# Altium PCB Kasli-DIOT.PCBDOC (part 3 of 23)
Units mm, origin at the board's own origin, x right, y up, seen from the top; angles counter-clockwise.
Board outline 222.9 x 100 mm, 10 copper layers (TopLayer, Layer 2, Layer 3, Layer 4, Layer 5, Layer 6, Layer 7, layer 8, Layer 9, BottomLayer), stack 1.564 mm thick; 977 components, 900 nets, 4676 pads, 2725 vias.
Unrouted connection lines stored in the file: 17.
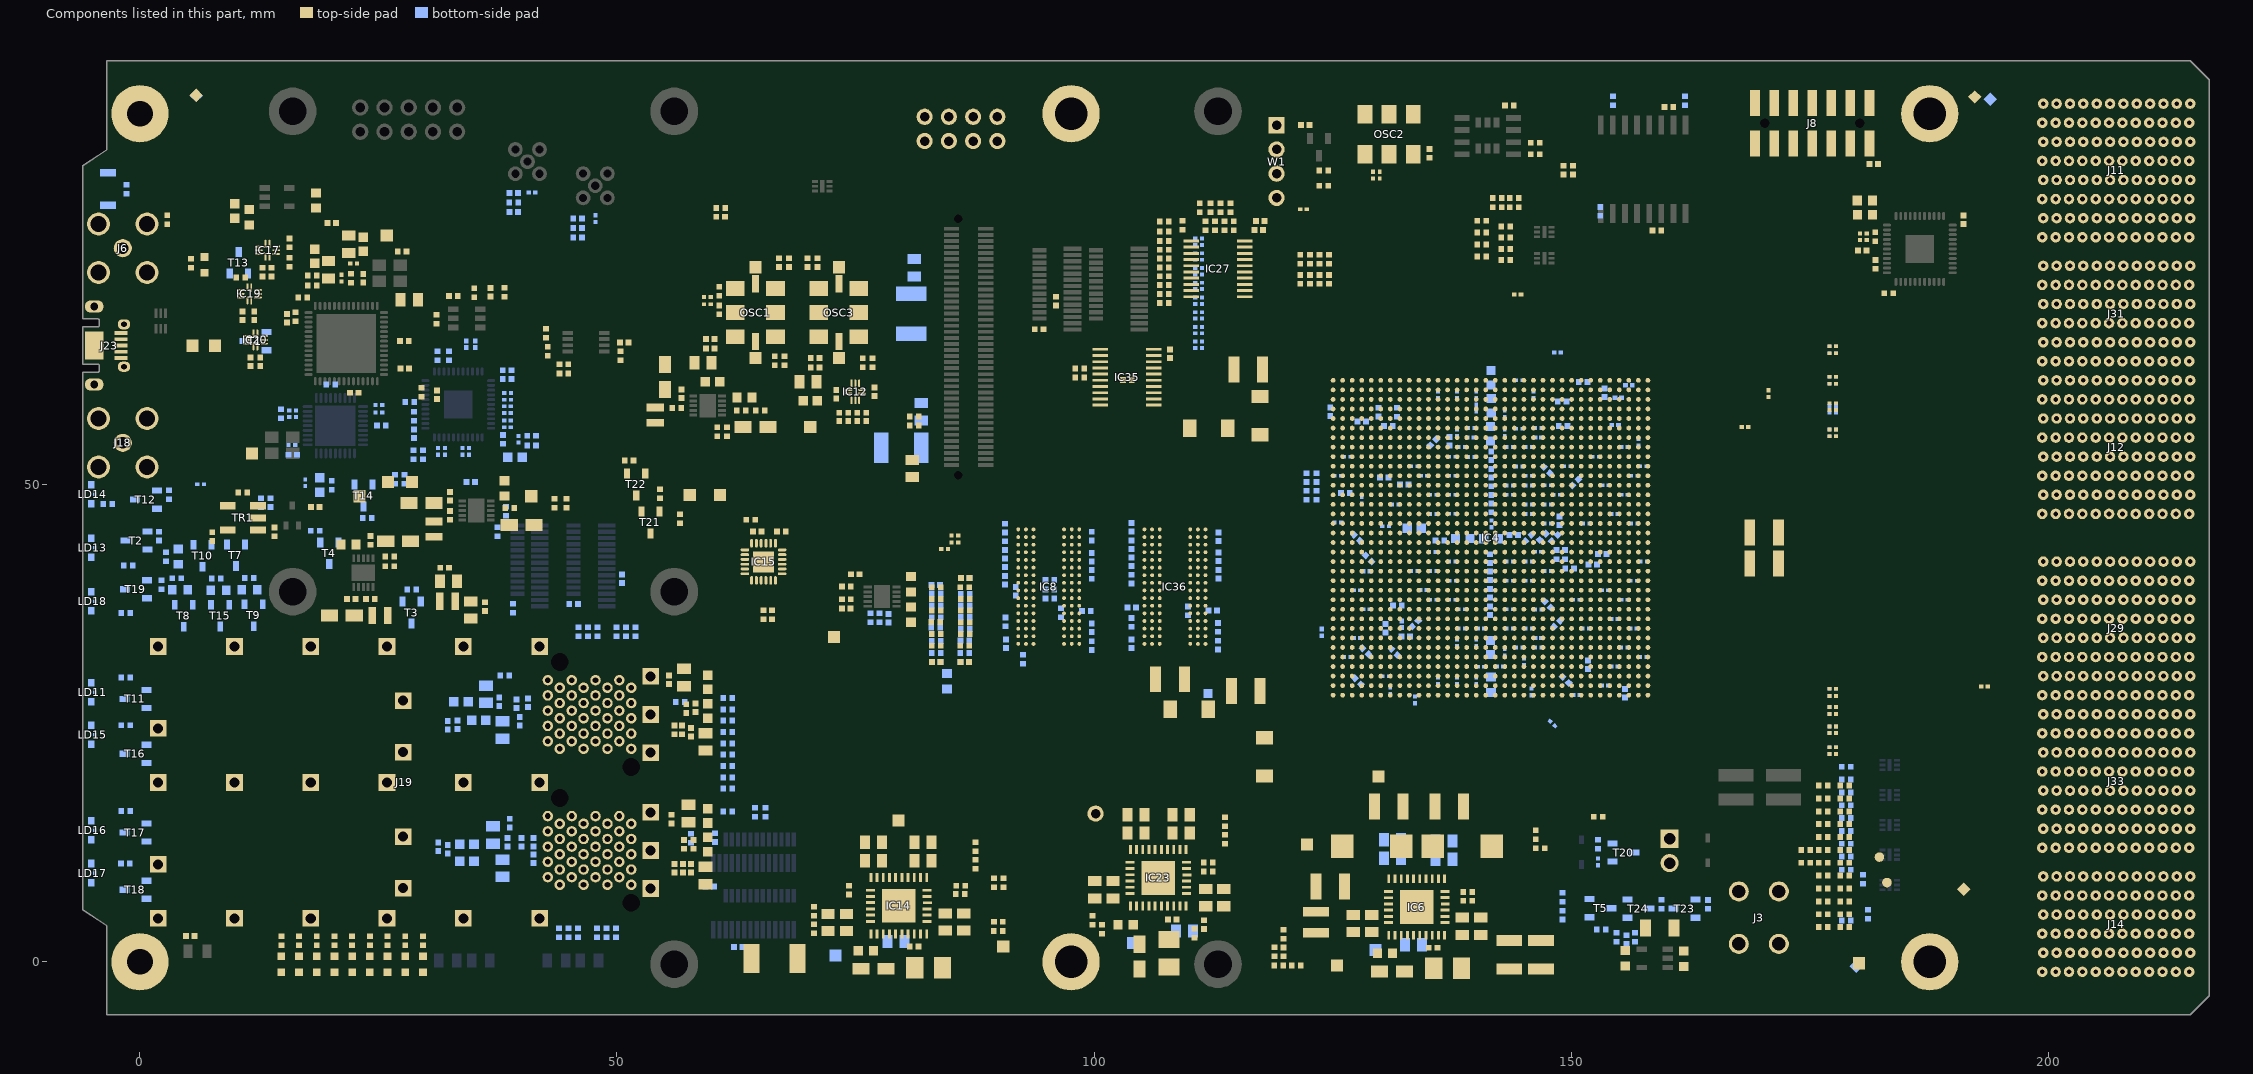
[diagram p11: the components of this part, seen from the top]

## Components (designator, comment, footprint, x,y, rotation, side; value= is the part's Value field where it differs from the comment) (continued)
R161 "100" RESC0603X28N 146.561,54.95 r180 bottom
R162 "10k" RESC1005X40N 121.621,73.645 r90 top
R163 "10k" RESC1005X40N 122.621,73.645 r90 top
R164 "10k" RESC1005X40N 123.621,73.645 r90 top
R165 "10k" RESC1005X40N 124.621,73.645 r90 top
R166 "10k" RESC1005X40N 121.621,71.52 r90 top
R167 "10k" RESC1005X40N 122.621,71.52 r90 top
R168 "10k" RESC1005X40N 123.621,71.52 r90 top
R169 "10k" RESC1005X40N 124.621,71.52 r90 top
R170 "10k" RESC1005X40N 142.266,79.093 r180 top
R171 "10k" RESC1005X40N 142.266,80.068 r180 top
R172 "10k" RESC1005X40N 144.066,79.093 r180 top
R173 "10k" RESC1005X40N 144.066,80.068 r180 top
R174 "10k" RESC1005X40N 38.761,14.55 r90 bottom
R175 "0" RESC1005X40N 65.56,15.66 r90 bottom
R176 "10k" RESC1005X40N 65.375,36.367 r270 top
R177 "10k" RESC1005X40N 66.261,36.367 r270 top
R178 "47k" RESC1005X40N 114.647,77.159 r90 top
R179 "47k" RESC1005X40N 114.286,79.063 r90 top
R180 "47k" RESC1005X40N 113.659,77.159 r90 top
R181 "47k" RESC1005X40N 113.245,79.063 r90 top
R182 "47k" RESC1005X40N 112.672,77.159 r90 top
R183 "10k" RESC1005X40N 61.606,21.716 r0 bottom
R184 "10k" RESC1005X40N 61.606,24.092 r0 bottom
R185 "10k" RESC1005X40N 51.947,34.595 r90 bottom
R186 "10k" RESC1005X40N 49.947,34.595 r90 bottom
R187 "10k" RESC1005X40N 43.913,3.055 r270 bottom
R188 "10k" RESC1005X40N 45.913,3.055 r270 bottom
R189 "10k" RESC1005X40N 43.461,48.075 r270 top
R190 "10k" RESC1005X40N 44.686,48.05 r270 top
R191 "47k" RESC1005X40N 112.194,79.063 r90 top
R192 "47k" RESC1005X40N 111.684,77.159 r90 top
R193 "10k" RESC1005X40N 61.606,19.34 r180 bottom
R194 "10k" RESC1005X40N 10.561,71.75 r0 top
R195 "10k" RESC1005X40N 15.657,75.349 r90 top
R196 "10k" RESC1005X40N 15.657,73.317 r270 top
R197 "10k" RESC1005X40N 17.054,69.634 r180 top
R198 "10k" RESC1005X40N 16.292,67.602 r270 top
R199 "12k" RESC1005X40N 22.134,71.666 r270 top
R200 "2k2" RESC1005X40N 18.07,70.904 r0 top
R201 "10k" RESC1005X40N 18.07,71.92 r0 top
R202 "10k" RESC1005X40N 31.086,67.375 r270 top
R203 "10k" RESC1005X40N 35.036,70.15 r90 top
R204 "10k" RESC1005X40N 38.211,70.2 r90 top
R205 "2k2" RESC1005X40N 32.861,69.797 r0 top
R206 "10k" RESC1005X40N 42.575,65.875 r90 top
R207 "10k" RESC1005X40N 42.746,64.021 r270 top
R208 "2k2" RESC1005X40N 50.361,63.55 r90 top
R209 "10k" RESC1005X40N 23.811,46.5 r0 bottom
R210 "10k" RESC1005X40N 123.331,48.906 r90 bottom
R211 "10k" RESC1005X40N 122.29,48.906 r90 bottom
R212 "47k" RESC1005X40N 111.085,79.063 r90 top
R213 "10k" RESC1005X40N 46.947,34.595 r270 bottom
R214 "0" RESC1005X40N 7.574,44.581 r90 top
R215 "10k" RESC1005X40N 61.606,18.152 r180 bottom
R216 "240" RESC1005X40N -1.489,15.8 r180 bottom
R217 "10k" RESC1005X40N 61.606,15.776 r0 bottom
R218 "10k" RESC1005X40N 49.913,3.055 r270 bottom
R219 "10k" RESC1005X40N 57.761,12.946 r90 bottom
R220 "240" RESC1005X40N -1.519,10.3 r180 bottom
R221 "1k" RESC1005X40N 107.383,75.571 r0 top
R222 "10k" RESC1005X40N 48.913,3.055 r90 bottom
R223 "10k" RESC1005X40N 47.913,3.055 r90 bottom
R224 "1k" RESC1005X40N 107.383,74.643 r0 top
R225 "10k" RESC1005X40N 81.161,57.14 r180 top
R226 "240" RESC1005X40N -1.489,36.55 r0 bottom
R227 "2k2" RESC1005X40N 2.236,39.525 r90 bottom
R228 "1k" RESC1005X40N 107.383,73.714 r0 top
R229 "1k" RESC1005X40N 107.383,72.786 r0 top
R230 "1k" RESC1005X40N 107.383,76.57 r0 top
R231 "1k" RESC1005X40N 98.498,61.241 r0 top
R232 "1k" RESC1005X40N 107.383,71.857 r0 top
R233 "1k" RESC1005X40N 107.383,70.928 r0 top
R234 "1k" RESC1005X40N 107.383,70 r0 top
R235 "1k" RESC1005X40N 107.383,69.071 r0 top
R236 "0" RESC1005X40N 26.711,50.6 r90 bottom
R237 "0" RESC1005X40N 27.712,50.6 r90 bottom
R238 "0" RESC1005X40N 103.508,60.965 r0 top
R239 "0" RESC1005X40N 143.155,73.543 r0 top
R240 "10k" RESC1005X40N 98.502,62.189 r0 top
R241 "200k" RESC1005X40N 44.443,61.683 r180 top
R242 "10k" RESC1005X40N 28.661,53.15 r270 bottom
R243 "10k" RESC1005X40N 29.661,53.15 r90 bottom
R244 "10k" RESC1005X40N 73.761,57.55 r180 top
R245 "10k" RESC1005X40N 75.636,57.55 r0 top
R246 "10k" RESC1005X40N 73.761,56.675 r0 top
R247 "10k" RESC1005X40N 75.636,56.675 r180 top
R248 "430k" RESC1005X40N 61.511,55.55 r270 top
R249 "0" RESC1005X40N 143.155,74.726 r0 top
R250 "82k" RESC1005X40N 26.164,42.465 r0 top
R251 "82k" RESC1005X40N 60.511,55.55 r90 top
R252 "10k" RESC1005X40N 26.164,41.465 r0 top
R253 "0" RESC1005X40N 32.486,46.786 r90 top
R254 "82k" RESC1005X40N 38.386,47.225 r90 bottom
R255 "33k" RESC1005X40N 38.761,47.55 r180 top
R256 "10k" RESC1005X40N 37.486,45.075 r270 bottom
R257 "0" RESC1005X40N 140.662,77.677 r0 top
R258 "1k" RESC1005X40N 164.341,6.008 r270 bottom
R259 "1k" RESC1005X40N 159.486,6.025 r90 bottom
R260 "10k" RESC1005X40N 156.711,2.595 r270 bottom
R261 "10k" RESC1005X40N 153.186,3.375 r180 bottom
R262 "22" RESC1005X40N 178.861,11.05 r0 bottom
R263 "22" RESC1005X40N 178.861,12.371 r0 bottom
R264 "10k" RESC1005X40N 146.261,84.65 r0 top
R265 "10k" RESC1005X40N 146.261,85.85 r0 top
R266 "22" RESC1005X40N 178.861,15.064 r0 bottom
R267 "22" RESC1005X40N 178.861,19.104 r0 bottom
R268 "22" RESC1005X40N 178.706,18.473 r0 top
R269 "22" RESC1005X40N 178.706,17.124 r0 top
R270 "22" RESC1005X40N 178.861,16.411 r0 bottom
R271 "22" RESC1005X40N 178.861,13.718 r0 bottom
R272 "22" RESC1005X40N 178.861,9.65 r0 bottom
R273 "100" RESC1005X40N 181.886,76 r90 top
R274 "0" RESC1005X40N 140.662,73.928 r0 top
R275 "0" RESC1005X40N 143.155,75.909 r0 top
R276 "22" RESC1005X40N 178.706,15.776 r0 top
R277 "22" RESC1005X40N 178.861,4.35 r0 bottom
R278 "22" RESC1005X40N 178.706,6.338 r0 top
R279 "22" RESC1005X40N 178.706,14.428 r0 top
R280 "22" RESC1005X40N 178.706,13.079 r0 top
R281 "22" RESC1005X40N 178.706,11.731 r0 top
R282 "22" RESC1005X40N 178.706,3.641 r0 top
R283 "22" RESC1005X40N 178.706,7.686 r0 top
R284 "22" RESC1005X40N 178.706,10.383 r0 top
R285 "22" RESC1005X40N 178.706,9.034 r0 top
R286 "22" RESC1005X40N 178.706,4.989 r0 top
R287 "22" RESC1005X40N 178.861,17.757 r0 bottom
R288 "22" RESC1005X40N 178.861,20.45 r0 bottom
R289 "10k" RESC1005X40N -1.4,81 r90 bottom
R290 "0" RESC1005X40N 140.662,75.178 r0 top
R291 "0" RESC1005X40N 140.662,76.428 r0 top
R292 "0" RESC1005X40N 152.832,15.206 r0 top
R293 "4k7" RESC1005X40N 181.111,4.989 r270 bottom
R294 "4k7" RESC1005X40N 180.586,8.633 r270 bottom
R295 "4k7" RESC1005X40N 174.604,10.383 r0 top
R296 "4k7" RESC1005X40N 174.611,11.731 r0 top
R297 "47k" RESC1005X40N 109.288,77.196 r270 top
R298 "39" RESC1005X40N 95.386,38.075 r180 bottom
R299 "3k3" RESC1608X55N 4.194,39.001 r0 bottom
R300 "4k7" RESC1005X40N 176.456,4.989 r180 top
R301 "0" RESC1005X40N 2.859,77.776 r270 top
R302 "3k3" RESC1608X55N 11.476,38.981 r0 bottom
R303 "3k3" RESC1608X55N 4.011,42.475 r270 bottom
R304 "200" RESC1005X40N 60.715,68.325 r90 top
R305 "200" RESC1005X40N 60.721,70.297 r270 top
R306 "10k" RESC1005X40N 3.872,40.204 r0 bottom
R307 "10k" RESC1005X40N 11.462,40.235 r0 bottom
R308 "10k" RESC1005X40N 2.747,42.45 r270 bottom
R309 "3k3" RESC1608X55N 8.225,38.962 r0 bottom
R310 "10k" RESC1005X40N 7.986,40.175 r0 bottom
SW1 "Switch" SW_OMRON_B3U-3000PM -3.364,81 r90 bottom
T1 "BSS138LT1G" SOT95P240X110-3N 12.101,65.062 r180 bottom
T2 "BSS138LT1G" SOT95P240X110-3N -0.386,44.162 r180 bottom
T3 "BSS138LT1G" SOT95P240X110-3N 28.474,36.61 r270 bottom
T4 "BSS138LT1G" SOT95P240X110-3N 19.844,42.825 r270 bottom
T5 "BSS138LT1G" SOT95P240X110-3N 153.111,5.625 r0 bottom
T7 "BSS138LT1G" SOT95P240X110-3N 10.061,42.617 r270 bottom
T8 "BC847B" SOT95P230X110-3N 4.586,36.287 r270 bottom
T9 "BC847B" SOT95P230X110-3N 11.911,36.313 r270 bottom
T10 "BC847B" SOT95P230X110-3N 6.554,42.55 r270 bottom
T11 "BSS138LT1G" SOT95P240X110-3N -0.489,27.55 r180 bottom
T12 "BSS138LT1G" SOT95P240X110-3N 0.624,48.45 r180 bottom
T13 "BSS138LT1G" SOT95P240X110-3N 10.361,73.275 r90 bottom
T14 "BSS138LT1G" SOT95P240X110-3N 23.436,48.875 r270 bottom
T15 "BC847B" SOT95P230X110-3N 8.405,36.298 r270 bottom
T16 "BSS138LT1G" SOT95P240X110-3N -0.489,21.8 r180 bottom
T17 "BSS138LT1G" SOT95P240X110-3N -0.489,13.55 r180 bottom
T18 "BSS138LT1G" SOT95P240X110-3N -0.489,7.55 r180 bottom locked
T19 "BSS138LT1G" SOT95P240X110-3N -0.438,39.05 r180 bottom
T20 "BSS138LT1G" SOT95P240X110-3N 155.511,11.45 r0 bottom
T21 "BSS138LT1G" SOT95P240X110-3N 53.511,46.05 r270 top
T22 "BSS138LT1G" SOT95P240X110-3N 52.011,50.05 r270 top
T23 "BSS138LT1G" SOT95P240X110-3N 161.911,5.575 r180 bottom
T24 "BSS138LT1G" SOT95P240X110-3N 157.061,5.575 r0 bottom
TP1 "Test Point" TPS127 11.761,53.3 r0 top
TP2 "Test Point" TPS127 26.011,50.3 r0 top
TP3 "Test Point" TPS127 28.511,50.3 r0 top
TP4 "Test Point" TPS127 70.261,56.05 r270 top
TP5 "Test Point" TPS127 129.509,1.258 r90 bottom
TP6 "Test Point" TPS127 180.174,-0.156 r270 top
TP7 "Test Point" TPS127 72.74,34.035 r0 top
TP8 "Test Point" TPS127 79.511,14.825 r90 top
TP9 "Test Point" TPS127 129.811,19.425 r90 top
TP10 "Test Point" TPS127 90.492,1.625 r90 top
TP11 "Test Point" TPS127 122.336,12.3 r180 top
TP12 "Test Point" TPS127 125.461,-0.375 r180 top
TP15 "Test Point" TPS127 25.861,76.125 r90 top
TP16 "Test Point" TPS127 7.874,64.575 r90 top
TP17 "Test Point" TPS127 5.524,64.575 r90 top
TP18 "Test Point" TPS127 57.629,48.925 r90 top
TP19 "Test Point" TPS127 60.779,48.925 r90 top
TP20 "Test Point" TPS127 23.011,48.8 r90 top
TP21 "Test Point" TPS127 64.511,63.3 r90 top
TP22 "Test Point" TPS127 64.511,72.8 r90 top
TP23 "Test Point" TPS127 73.261,63.3 r270 top
TP24 "Test Point" TPS127 73.261,72.8 r270 top
TP25 "Test Point" TPS127 41.011,48.8 r0 top
TP26 "Plated Hole" c170h100 87.326,86.035 r0 top
TP27 "Plated Hole" c170h100 84.786,86.035 r0 top
TP28 "Plated Hole" c170h100 89.866,88.575 r0 top
TP29 "Plated Hole" c170h100 87.326,88.575 r0 top
TP30 "Plated Hole" c170h100 84.786,88.575 r0 top
TP31 "Plated Hole" c170h100 89.866,86.035 r270 top
TP32 "Plated Hole" c170h100 82.246,88.575 r0 top
TP33 "Plated Hole" c170h100 82.246,86.035 r180 top
TP34 "Test Point" TPS127 72.9,0.675 r0 bottom
TP35 "Plated Hole" c170h100 100.161,15.534 r0 top
TP36 "Test Point" TPS127 104.1,1.975 r180 bottom
TR1 "1:2" XFMR_MINI-CIRCUITS_AT1521 10.786,46.525 r270 top
W1 "Header 4" SAMTEC_HTSW-104-23-L-S 119.136,87.69 r270 top
WASHER1 "D11.1xd6.6" Keystone_7687 -51.473,85.385 r0 top
WASHER2 "D11.1xd6.6" Keystone_7687 -48.398,85.385 r0 top

## Footprints (in the part's own frame and the unit in brackets; to place one, negate y for a bottom-side part, rotate by r counter-clockwise, add the part's x,y. Pads: shape width x height; smd on the part's side, far side on the other; paste and mask are expansions set on the pad)
AMPHENOL_919-383J-51A [mm] "50 Ohm, RF Connector, MCX Right Angle PCB Receptacle Jack"
  round 1.9 hole 1.2: 1(0,0)
  round 2.4 hole 1.7: 2(-2.54,2.54) 2(-2.54,-2.54) 2(2.54,2.54) 2(2.54,-2.54)
  silkscreen extent -3,-3 6.5,3, body extent -3,-3 6.5,3, height 6
AMPHENOL_10052824-101LF [mm] "72 Contacts, 2mm Pitch, 6 Columns, 4 Pairs per Column, 2 Walls, Right Angle Header"
  round 1.1 hole 0.5: A1(-5,-7.65) A2(-3,-7.75) A3(-1,-7.65) A4(1,-7.75) A5(3,-7.65) A6(5,-7.75) B1(-5,-6.25) B2(-3,-6.35) B3(-1,-6.25) B4(1,-6.35) B5(3,-6.25) B6(5,-6.35) C1(-5,-4.85) C2(-3,-4.95) C3(-1,-4.85) C4(1,-4.95) C5(3,-4.85) C6(5,-4.95) D1(-5,-3.45) D2(-3,-3.55) D3(-1,-3.45) D4(1,-3.55) D5(3,-3.45) D6(5,-3.55) E1(-5,-2.05) E2(-3,-2.15) E3(-1,-2.05) E4(1,-2.15) E5(3,-2.05) E6(5,-2.15) F1(-5,-0.65) F2(-3,-0.75) F3(-1,-0.65) F4(1,-0.75) F5(3,-0.65) F6(5,-0.75) G1(-5,0.75) G2(-3,0.65) G3(-1,0.75) G4(1,0.65) G5(3,0.75) G6(5,0.65) H1(-5,2.15) H2(-3,2.05) H3(-1,2.15) H4(1,2.05) H5(3,2.15) H6(5,2.05) I1(-5,3.55) I2(-3,3.45) I3(-1,3.55) I4(1,3.45) I5(3,3.55) I6(5,3.45) J1(-5,4.95) J2(-3,4.85) J3(-1,4.95) J4(1,4.85) J5(3,4.95) J6(5,4.85) K1(-5,6.35) K2(-3,6.25) K3(-1,6.35) K4(1,6.25) K5(3,6.35) K6(5,6.25) L1(-5,7.75) L2(-3,7.65) L3(-1,7.75) L4(1,7.65) L5(3,7.75) L6(5,7.65)
  silkscreen extent -5.95,-21.95 5.95,11.85, body extent -5.95,-21.95 5.95,11.85, height 15.25
AMPHENOL_10052825-101LF [mm] "72 Contacts, 2mm Pitch, 6 Columns, 4 Pairs per Column, 4 Walls, Right Angle Header"
  round 1.1 hole 0.5: A1(-5,-7.65) A2(-3,-7.75) A3(-1,-7.65) A4(1,-7.75) A5(3,-7.65) A6(5,-7.75) B1(-5,-6.25) B2(-3,-6.35) B3(-1,-6.25) B4(1,-6.35) B5(3,-6.25) B6(5,-6.35) C1(-5,-4.85) C2(-3,-4.95) C3(-1,-4.85) C4(1,-4.95) C5(3,-4.85) C6(5,-4.95) D1(-5,-3.45) D2(-3,-3.55) D3(-1,-3.45) D4(1,-3.55) D5(3,-3.45) D6(5,-3.55) E1(-5,-2.05) E2(-3,-2.15) E3(-1,-2.05) E4(1,-2.15) E5(3,-2.05) E6(5,-2.15) F1(-5,-0.65) F2(-3,-0.75) F3(-1,-0.65) F4(1,-0.75) F5(3,-0.65) F6(5,-0.75) G1(-5,0.75) G2(-3,0.65) G3(-1,0.75) G4(1,0.65) G5(3,0.75) G6(5,0.65) H1(-5,2.15) H2(-3,2.05) H3(-1,2.15) H4(1,2.05) H5(3,2.15) H6(5,2.05) I1(-5,3.55) I2(-3,3.45) I3(-1,3.55) I4(1,3.45) I5(3,3.55) I6(5,3.45) J1(-5,4.95) J2(-3,4.85) J3(-1,4.95) J4(1,4.85) J5(3,4.95) J6(5,4.85) K1(-5,6.35) K2(-3,6.25) K3(-1,6.35) K4(1,6.25) K5(3,6.35) K6(5,6.25) L1(-5,7.75) L2(-3,7.65) L3(-1,7.75) L4(1,7.65) L5(3,7.75) L6(5,7.65)
  silkscreen extent -6.95,-21.95 6.95,11.85, body extent -6.95,-21.95 6.95,11.85, height 15.25
AMPHENOL_10052837-101LF [mm] "96 Contacts, 2mm Pitch, 8 Columns, 4 Pairs per Column, 2 Walls, Right Angle Header"
  round 1.1 hole 0.5: A1(-7,-7.65) A2(-5,-7.75) A3(-3,-7.65) A4(-1,-7.75) A5(1,-7.65) A6(3,-7.75) A7(5,-7.65) A8(7,-7.75) B1(-7,-6.25) B2(-5,-6.35) B3(-3,-6.25) B4(-1,-6.35) B5(1,-6.25) B6(3,-6.35) B7(5,-6.25) B8(7,-6.35) C1(-7,-4.85) C2(-5,-4.95) C3(-3,-4.85) C4(-1,-4.95) C5(1,-4.85) C6(3,-4.95) C7(5,-4.85) C8(7,-4.95) D1(-7,-3.45) D2(-5,-3.55) D3(-3,-3.45) D4(-1,-3.55) D5(1,-3.45) D6(3,-3.55) D7(5,-3.45) D8(7,-3.55) E1(-7,-2.05) E2(-5,-2.15) E3(-3,-2.05) E4(-1,-2.15) E5(1,-2.05) E6(3,-2.15) E7(5,-2.05) E8(7,-2.15) F1(-7,-0.65) F2(-5,-0.75) F3(-3,-0.65) F4(-1,-0.75) F5(1,-0.65) F6(3,-0.75) F7(5,-0.65) F8(7,-0.75) G1(-7,0.75) G2(-5,0.65) G3(-3,0.75) G4(-1,0.65) G5(1,0.75) G6(3,0.65) G7(5,0.75) G8(7,0.65) H1(-7,2.15) H2(-5,2.05) H3(-3,2.15) H4(-1,2.05) H5(1,2.15) H6(3,2.05) H7(5,2.15) H8(7,2.05) I1(-7,3.55) I2(-5,3.45) I3(-3,3.55) I4(-1,3.45) I5(1,3.55) I6(3,3.45) I7(5,3.55) I8(7,3.45) J1(-7,4.95) J2(-5,4.85) J3(-3,4.95) J4(-1,4.85) J5(1,4.95) J6(3,4.85) J7(5,4.95) J8(7,4.85) K1(-7,6.35) K2(-5,6.25) K3(-3,6.35) K4(-1,6.25) K5(1,6.35) K6(3,6.25) K7(5,6.35) K8(7,6.25) L1(-7,7.75) L2(-5,7.65) L3(-3,7.75) L4(-1,7.65) L5(1,7.75) L6(3,7.65) L7(5,7.75) L8(7,7.65)
  silkscreen extent -7.95,-21.95 7.95,11.85, body extent -7.95,-21.95 7.95,11.85, height 15.25
AMPHENOL_10052838-101LF [mm] "96 Contacts, 2mm Pitch, 8 Columns, 4 Pairs per Column, 4 Walls, Right Angle Header"
  round 1.1 hole 0.5: A1(-7,-7.65) A2(-5,-7.75) A3(-3,-7.65) A4(-1,-7.75) A5(1,-7.65) A6(3,-7.75) A7(5,-7.65) A8(7,-7.75) B1(-7,-6.25) B2(-5,-6.35) B3(-3,-6.25) B4(-1,-6.35) B5(1,-6.25) B6(3,-6.35) B7(5,-6.25) B8(7,-6.35) C1(-7,-4.85) C2(-5,-4.95) C3(-3,-4.85) C4(-1,-4.95) C5(1,-4.85) C6(3,-4.95) C7(5,-4.85) C8(7,-4.95) D1(-7,-3.45) D2(-5,-3.55) D3(-3,-3.45) D4(-1,-3.55) D5(1,-3.45) D6(3,-3.55) D7(5,-3.45) D8(7,-3.55) E1(-7,-2.05) E2(-5,-2.15) E3(-3,-2.05) E4(-1,-2.15) E5(1,-2.05) E6(3,-2.15) E7(5,-2.05) E8(7,-2.15) F1(-7,-0.65) F2(-5,-0.75) F3(-3,-0.65) F4(-1,-0.75) F5(1,-0.65) F6(3,-0.75) F7(5,-0.65) F8(7,-0.75) G1(-7,0.75) G2(-5,0.65) G3(-3,0.75) G4(-1,0.65) G5(1,0.75) G6(3,0.65) G7(5,0.75) G8(7,0.65) H1(-7,2.15) H2(-5,2.05) H3(-3,2.15) H4(-1,2.05) H5(1,2.15) H6(3,2.05) H7(5,2.15) H8(7,2.05) I1(-7,3.55) I2(-5,3.45) I3(-3,3.55) I4(-1,3.45) I5(1,3.55) I6(3,3.45) I7(5,3.55) I8(7,3.45) J1(-7,4.95) J2(-5,4.85) J3(-3,4.95) J4(-1,4.85) J5(1,4.95) J6(3,4.85) J7(5,4.95) J8(7,4.85) K1(-7,6.35) K2(-5,6.25) K3(-3,6.35) K4(-1,6.25) K5(1,6.35) K6(3,6.25) K7(5,6.35) K8(7,6.25) L1(-7,7.75) L2(-5,7.65) L3(-3,7.75) L4(-1,7.65) L5(1,7.75) L6(3,7.65) L7(5,7.75) L8(7,7.65)
  silkscreen extent -8.95,-21.95 8.95,11.85, body extent -8.95,-21.95 8.95,11.85, height 15.25
AMPHENOL_U77A11108000P [mm] "Plastic Dust Cover SFP Cage"
  silkscreen extent -4,-6.82 4.9,7.87, body extent -4.03,-6.82 4.9,7.87, height 5.1
AMPHENOL_UE78B212700321 [mm] "SFP 2x2 Press Fit Cage with 4x20 Positions Integrated Receptacles"
  round 1.1 hole 0.6: LB1(-1.25,3.52) LB2(-2.5,4.32) LB3(-1.25,5.12) LB4(-2.5,5.92) LB5(-1.25,6.72) LB6(-2.5,7.52) LB7(-1.25,8.32) LB8(-2.5,9.12) LB9(-1.25,9.92) LB10(-2.5,10.72) LB11(-5,10.72) LB12(-3.75,9.92) LB13(-5,9.12) LB14(-3.75,8.32) LB15(-5,7.52) LB16(-3.75,6.72) LB17(-5,5.92) LB18(-3.75,5.12) LB19(-5,4.32) LB20(-3.75,3.52) LT1(0,10.72) LT2(1.25,9.92) LT3(0,9.12) LT4(1.25,8.32) LT5(0,7.52) LT6(1.25,6.72) LT7(0,5.92) LT8(1.25,5.12) LT9(0,4.32) LT10(1.25,3.52) LT11(3.75,3.52) LT12(2.5,4.32) LT13(3.75,5.12) LT14(2.5,5.92) LT15(3.75,6.72) LT16(2.5,7.52) LT17(3.75,8.32) LT18(2.5,9.12) LT19(3.75,9.92) LT20(2.5,10.72) RB1(-1.25,-10.73) RB2(-2.5,-9.93) RB3(-1.25,-9.13) RB4(-2.5,-8.33) RB5(-1.25,-7.53) RB6(-2.5,-6.73) RB7(-1.25,-5.93) RB8(-2.5,-5.13) RB9(-1.25,-4.33) RB10(-2.5,-3.53) RB11(-5,-3.53) RB12(-3.75,-4.33) RB13(-5,-5.13) RB14(-3.75,-5.93) RB15(-5,-6.73) RB16(-3.75,-7.53) RB17(-5,-8.33) RB18(-3.75,-9.13) RB19(-5,-9.93) RB20(-3.75,-10.73) RT1(0,-3.53) RT2(1.25,-4.33) RT3(0,-5.13) RT4(1.25,-5.93) RT5(0,-6.73) RT6(1.25,-7.53) RT7(0,-8.33) RT8(1.25,-9.13) RT9(0,-9.93) RT10(1.25,-10.73) RT11(3.75,-10.73) RT12(2.5,-9.93) RT13(3.75,-9.13) RT14(2.5,-8.33) RT15(3.75,-7.53) RT16(2.5,-6.73) RT17(3.75,-5.93) RT18(2.5,-5.13) RT19(3.75,-4.33) RT20(2.5,-3.53)
  round 0.5 hole 1.85 unplated: MECH1(-3.75,12.62) MECH2(3.75,1.62) MECH3(-3.75,-1.63) MECH4(3.75,-12.63)
  rect 1.75x1.75 hole 1.05: SHIELD(-45.85,-14.25) SHIELD(-45.85,-8.58) SHIELD(-45.85,0) SHIELD(-45.85,5.67) SHIELD(-45.85,14.25) SHIELD(-37.85,-14.25) SHIELD(-37.85,0) SHIELD(-37.85,14.25) SHIELD(-29.85,-14.25) SHIELD(-29.85,0) SHIELD(-29.85,14.25) SHIELD(-21.85,-14.25) SHIELD(-21.85,0) SHIELD(-21.85,14.25) SHIELD(-20.17,-11.08) SHIELD(-20.17,-5.68) SHIELD(-20.17,3.17) SHIELD(-20.17,8.57) SHIELD(-13.85,-14.25) SHIELD(-13.85,0) SHIELD(-13.85,14.25) SHIELD(-5.85,-14.25) SHIELD(-5.85,0) SHIELD(-5.85,14.25) SHIELD(5.78,-11.13) SHIELD(5.78,-7.13) SHIELD(5.78,-3.13) SHIELD(5.78,3.12) SHIELD(5.78,7.12) SHIELD(5.78,11.12)
  silkscreen extent -57.35,-15.32 5.9,15.31, body extent -57.35,-15.32 5.9,15.31, height 26.39
BGA96C80P9X16_800X1400X120 [mm] "BGA, 0.80mm Pitch, Rect.; 96 Pin, 9 Columns X 16 Rows, 8.00mm X 14.00mm X 1.20mm H"
  round 0.4 smd: A1(-3.2,6) A2(-2.4,6) A3(-1.6,6) A7(1.6,6) A8(2.4,6) A9(3.2,6) B1(-3.2,5.2) B2(-2.4,5.2) B3(-1.6,5.2) B7(1.6,5.2) B8(2.4,5.2) B9(3.2,5.2) C1(-3.2,4.4) C2(-2.4,4.4) C3(-1.6,4.4) C7(1.6,4.4) C8(2.4,4.4) C9(3.2,4.4) D1(-3.2,3.6) D2(-2.4,3.6) D3(-1.6,3.6) D7(1.6,3.6) D8(2.4,3.6) D9(3.2,3.6) E1(-3.2,2.8) E2(-2.4,2.8) E3(-1.6,2.8) E7(1.6,2.8) E8(2.4,2.8) E9(3.2,2.8) F1(-3.2,2) F2(-2.4,2) F3(-1.6,2) F7(1.6,2) F8(2.4,2) F9(3.2,2) G1(-3.2,1.2) G2(-2.4,1.2) G3(-1.6,1.2) G7(1.6,1.2) G8(2.4,1.2) G9(3.2,1.2) H1(-3.2,0.4) H2(-2.4,0.4) H3(-1.6,0.4) H7(1.6,0.4) H8(2.4,0.4) H9(3.2,0.4) J1(-3.2,-0.4) J2(-2.4,-0.4) J3(-1.6,-0.4) J7(1.6,-0.4) J8(2.4,-0.4) J9(3.2,-0.4) K1(-3.2,-1.2) K2(-2.4,-1.2) K3(-1.6,-1.2) K7(1.6,-1.2) K8(2.4,-1.2) K9(3.2,-1.2) L1(-3.2,-2) L2(-2.4,-2) L3(-1.6,-2) L7(1.6,-2) L8(2.4,-2) L9(3.2,-2) M1(-3.2,-2.8) M2(-2.4,-2.8) M3(-1.6,-2.8) M7(1.6,-2.8) M8(2.4,-2.8) M9(3.2,-2.8) N1(-3.2,-3.6) N2(-2.4,-3.6) N3(-1.6,-3.6) N7(1.6,-3.6) N8(2.4,-3.6) N9(3.2,-3.6) P1(-3.2,-4.4) P2(-2.4,-4.4) P3(-1.6,-4.4) P7(1.6,-4.4) P8(2.4,-4.4) P9(3.2,-4.4) R1(-3.2,-5.2) R2(-2.4,-5.2) R3(-1.6,-5.2) R7(1.6,-5.2) R8(2.4,-5.2) R9(3.2,-5.2) T1(-3.2,-6) T2(-2.4,-6) T3(-1.6,-6) T7(1.6,-6) T8(2.4,-6) T9(3.2,-6)
  silkscreen extent -4.72,-7 4,7, body extent -4.07,-7.07 4.08,7.08, height 1.2
BGA1156C100P34X34_3500X3500X310 [mm] "BGA, 1.00mm Pitch, Square; 1156 Pin, 34 Columns X 34 Rows, 35.00mm X 35.00mm X 3.10mm H"
  round 0.5 smd: A1(-16.5,16.5) A2(-15.5,16.5) A3(-14.5,16.5) A4(-13.5,16.5) A5(-12.5,16.5) A6(-11.5,16.5) A7(-10.5,16.5) A8(-9.5,16.5) A9(-8.5,16.5) A10(-7.5,16.5) A11(-6.5,16.5) A12(-5.5,16.5) A13(-4.5,16.5) A14(-3.5,16.5) A15(-2.5,16.5) A16(-1.5,16.5) A17(-0.5,16.5) A18(0.5,16.5) A19(1.5,16.5) A20(2.5,16.5) A21(3.5,16.5) A22(4.5,16.5) A23(5.5,16.5) A24(6.5,16.5) A25(7.5,16.5) A26(8.5,16.5) A27(9.5,16.5) A28(10.5,16.5) A29(11.5,16.5) A30(12.5,16.5) A31(13.5,16.5) A32(14.5,16.5) A33(15.5,16.5) A34(16.5,16.5) AA1(-16.5,-3.5) AA2(-15.5,-3.5) AA3(-14.5,-3.5) AA4(-13.5,-3.5) AA5(-12.5,-3.5) AA6(-11.5,-3.5) AA7(-10.5,-3.5) AA8(-9.5,-3.5) AA9(-8.5,-3.5) AA10(-7.5,-3.5) AA11(-6.5,-3.5) AA12(-5.5,-3.5) AA13(-4.5,-3.5) AA14(-3.5,-3.5) AA15(-2.5,-3.5) AA16(-1.5,-3.5) AA17(-0.5,-3.5) AA18(0.5,-3.5) AA19(1.5,-3.5) AA20(2.5,-3.5) AA21(3.5,-3.5) AA22(4.5,-3.5) AA23(5.5,-3.5) AA24(6.5,-3.5) AA25(7.5,-3.5) AA26(8.5,-3.5) AA27(9.5,-3.5) AA28(10.5,-3.5) AA29(11.5,-3.5) AA30(12.5,-3.5) AA31(13.5,-3.5) AA32(14.5,-3.5) AA33(15.5,-3.5) AA34(16.5,-3.5) AB1(-16.5,-4.5) AB2(-15.5,-4.5) AB3(-14.5,-4.5) AB4(-13.5,-4.5) AB5(-12.5,-4.5) AB6(-11.5,-4.5) AB7(-10.5,-4.5) AB8(-9.5,-4.5) AB9(-8.5,-4.5) AB10(-7.5,-4.5) AB11(-6.5,-4.5) AB12(-5.5,-4.5) AB13(-4.5,-4.5) AB14(-3.5,-4.5) AB15(-2.5,-4.5) AB16(-1.5,-4.5) AB17(-0.5,-4.5) AB18(0.5,-4.5) AB19(1.5,-4.5) AB20(2.5,-4.5) AB21(3.5,-4.5) AB22(4.5,-4.5) AB23(5.5,-4.5) AB24(6.5,-4.5) AB25(7.5,-4.5) AB26(8.5,-4.5) AB27(9.5,-4.5) AB28(10.5,-4.5) AB29(11.5,-4.5) AB30(12.5,-4.5) AB31(13.5,-4.5) AB32(14.5,-4.5) AB33(15.5,-4.5) AB34(16.5,-4.5) AC1(-16.5,-5.5) AC2(-15.5,-5.5) AC3(-14.5,-5.5) AC4(-13.5,-5.5) AC5(-12.5,-5.5) AC6(-11.5,-5.5) AC7(-10.5,-5.5) AC8(-9.5,-5.5) AC9(-8.5,-5.5) AC10(-7.5,-5.5) AC11(-6.5,-5.5) AC12(-5.5,-5.5) AC13(-4.5,-5.5) AC14(-3.5,-5.5) AC15(-2.5,-5.5) AC16(-1.5,-5.5) AC17(-0.5,-5.5) AC18(0.5,-5.5) AC19(1.5,-5.5) AC20(2.5,-5.5) AC21(3.5,-5.5) AC22(4.5,-5.5) AC23(5.5,-5.5) AC24(6.5,-5.5) AC25(7.5,-5.5) AC26(8.5,-5.5) AC27(9.5,-5.5) AC28(10.5,-5.5) AC29(11.5,-5.5) AC30(12.5,-5.5) AC31(13.5,-5.5) AC32(14.5,-5.5) AC33(15.5,-5.5) AC34(16.5,-5.5) AD1(-16.5,-6.5) AD2(-15.5,-6.5) AD3(-14.5,-6.5) AD4(-13.5,-6.5) AD5(-12.5,-6.5) AD6(-11.5,-6.5) AD7(-10.5,-6.5) AD8(-9.5,-6.5) AD9(-8.5,-6.5) AD10(-7.5,-6.5) AD11(-6.5,-6.5) AD12(-5.5,-6.5) AD13(-4.5,-6.5) AD14(-3.5,-6.5) AD15(-2.5,-6.5) AD16(-1.5,-6.5) AD17(-0.5,-6.5) AD18(0.5,-6.5) AD19(1.5,-6.5) AD20(2.5,-6.5) AD21(3.5,-6.5) AD22(4.5,-6.5) AD23(5.5,-6.5) AD24(6.5,-6.5) AD25(7.5,-6.5) AD26(8.5,-6.5) AD27(9.5,-6.5) AD28(10.5,-6.5) AD29(11.5,-6.5) AD30(12.5,-6.5) AD31(13.5,-6.5) AD32(14.5,-6.5) AD33(15.5,-6.5) AD34(16.5,-6.5) AE1(-16.5,-7.5) AE2(-15.5,-7.5) AE3(-14.5,-7.5) AE4(-13.5,-7.5) AE5(-12.5,-7.5) AE6(-11.5,-7.5) AE7(-10.5,-7.5) AE8(-9.5,-7.5) AE9(-8.5,-7.5) AE10(-7.5,-7.5) AE11(-6.5,-7.5) AE12(-5.5,-7.5) AE13(-4.5,-7.5) AE14(-3.5,-7.5) AE15(-2.5,-7.5) AE16(-1.5,-7.5) AE17(-0.5,-7.5) AE18(0.5,-7.5) AE19(1.5,-7.5) AE20(2.5,-7.5) AE21(3.5,-7.5) AE22(4.5,-7.5) AE23(5.5,-7.5) AE24(6.5,-7.5) AE25(7.5,-7.5) AE26(8.5,-7.5) AE27(9.5,-7.5) AE28(10.5,-7.5) AE29(11.5,-7.5) AE30(12.5,-7.5) AE31(13.5,-7.5) AE32(14.5,-7.5) AE33(15.5,-7.5) AE34(16.5,-7.5) AF1(-16.5,-8.5) AF2(-15.5,-8.5) AF3(-14.5,-8.5) AF4(-13.5,-8.5) AF5(-12.5,-8.5) AF6(-11.5,-8.5) AF7(-10.5,-8.5) AF8(-9.5,-8.5) AF9(-8.5,-8.5) AF10(-7.5,-8.5) AF11(-6.5,-8.5) AF12(-5.5,-8.5) AF13(-4.5,-8.5) AF14(-3.5,-8.5) AF15(-2.5,-8.5) AF16(-1.5,-8.5) AF17(-0.5,-8.5) AF18(0.5,-8.5) AF19(1.5,-8.5) AF20(2.5,-8.5) AF21(3.5,-8.5) AF22(4.5,-8.5) AF23(5.5,-8.5) AF24(6.5,-8.5) AF25(7.5,-8.5) AF26(8.5,-8.5) AF27(9.5,-8.5) AF28(10.5,-8.5) AF29(11.5,-8.5) AF30(12.5,-8.5) AF31(13.5,-8.5) AF32(14.5,-8.5) AF33(15.5,-8.5) AF34(16.5,-8.5) AG1(-16.5,-9.5) AG2(-15.5,-9.5) AG3(-14.5,-9.5) AG4(-13.5,-9.5) AG5(-12.5,-9.5) AG6(-11.5,-9.5) AG7(-10.5,-9.5) AG8(-9.5,-9.5) AG9(-8.5,-9.5) AG10(-7.5,-9.5) AG11(-6.5,-9.5) AG12(-5.5,-9.5) AG13(-4.5,-9.5) AG14(-3.5,-9.5) AG15(-2.5,-9.5) AG16(-1.5,-9.5) AG17(-0.5,-9.5) AG18(0.5,-9.5) AG19(1.5,-9.5) AG20(2.5,-9.5) AG21(3.5,-9.5) AG22(4.5,-9.5) AG23(5.5,-9.5) AG24(6.5,-9.5) AG25(7.5,-9.5) AG26(8.5,-9.5) AG27(9.5,-9.5) AG28(10.5,-9.5) AG29(11.5,-9.5) AG30(12.5,-9.5) AG31(13.5,-9.5) AG32(14.5,-9.5) AG33(15.5,-9.5) AG34(16.5,-9.5) AH1(-16.5,-10.5) AH2(-15.5,-10.5) AH3(-14.5,-10.5) AH4(-13.5,-10.5) AH5(-12.5,-10.5) AH6(-11.5,-10.5) AH7(-10.5,-10.5) AH8(-9.5,-10.5) AH9(-8.5,-10.5) AH10(-7.5,-10.5) AH11(-6.5,-10.5) AH12(-5.5,-10.5) AH13(-4.5,-10.5) AH14(-3.5,-10.5) AH15(-2.5,-10.5) AH16(-1.5,-10.5) AH17(-0.5,-10.5) AH18(0.5,-10.5) AH19(1.5,-10.5) AH20(2.5,-10.5) AH21(3.5,-10.5) AH22(4.5,-10.5) AH23(5.5,-10.5) AH24(6.5,-10.5) AH25(7.5,-10.5) AH26(8.5,-10.5) AH27(9.5,-10.5) AH28(10.5,-10.5) AH29(11.5,-10.5) AH30(12.5,-10.5) AH31(13.5,-10.5) AH32(14.5,-10.5) AH33(15.5,-10.5) AH34(16.5,-10.5) AJ1(-16.5,-11.5) AJ2(-15.5,-11.5) AJ3(-14.5,-11.5) AJ4(-13.5,-11.5) AJ5(-12.5,-11.5) AJ6(-11.5,-11.5) AJ7(-10.5,-11.5) AJ8(-9.5,-11.5) AJ9(-8.5,-11.5) AJ10(-7.5,-11.5) AJ11(-6.5,-11.5) AJ12(-5.5,-11.5) AJ13(-4.5,-11.5) AJ14(-3.5,-11.5) AJ15(-2.5,-11.5) AJ16(-1.5,-11.5) AJ17(-0.5,-11.5) AJ18(0.5,-11.5) AJ19(1.5,-11.5) AJ20(2.5,-11.5) AJ21(3.5,-11.5) AJ22(4.5,-11.5) AJ23(5.5,-11.5) AJ24(6.5,-11.5) AJ25(7.5,-11.5) AJ26(8.5,-11.5) AJ27(9.5,-11.5) AJ28(10.5,-11.5) AJ29(11.5,-11.5) AJ30(12.5,-11.5) AJ31(13.5,-11.5) AJ32(14.5,-11.5) AJ33(15.5,-11.5) AJ34(16.5,-11.5) AK1(-16.5,-12.5) AK2(-15.5,-12.5) AK3(-14.5,-12.5) AK4(-13.5,-12.5) AK5(-12.5,-12.5) AK6(-11.5,-12.5) AK7(-10.5,-12.5) AK8(-9.5,-12.5) AK9(-8.5,-12.5) AK10(-7.5,-12.5) AK11(-6.5,-12.5) AK12(-5.5,-12.5) AK13(-4.5,-12.5) AK14(-3.5,-12.5) AK15(-2.5,-12.5) AK16(-1.5,-12.5) AK17(-0.5,-12.5) AK18(0.5,-12.5) AK19(1.5,-12.5) AK20(2.5,-12.5) AK21(3.5,-12.5) AK22(4.5,-12.5) AK23(5.5,-12.5) AK24(6.5,-12.5) AK25(7.5,-12.5) AK26(8.5,-12.5) AK27(9.5,-12.5) AK28(10.5,-12.5) AK29(11.5,-12.5) AK30(12.5,-12.5) AK31(13.5,-12.5) AK32(14.5,-12.5) AK33(15.5,-12.5) AK34(16.5,-12.5) AL1(-16.5,-13.5) AL2(-15.5,-13.5) AL3(-14.5,-13.5) AL4(-13.5,-13.5) AL5(-12.5,-13.5) AL6(-11.5,-13.5) AL7(-10.5,-13.5) AL8(-9.5,-13.5) AL9(-8.5,-13.5) AL10(-7.5,-13.5) AL11(-6.5,-13.5) AL12(-5.5,-13.5) AL13(-4.5,-13.5) AL14(-3.5,-13.5) AL15(-2.5,-13.5) AL16(-1.5,-13.5) AL17(-0.5,-13.5) AL18(0.5,-13.5) AL19(1.5,-13.5) AL20(2.5,-13.5) AL21(3.5,-13.5) AL22(4.5,-13.5) AL23(5.5,-13.5) AL24(6.5,-13.5) AL25(7.5,-13.5) AL26(8.5,-13.5) AL27(9.5,-13.5) AL28(10.5,-13.5) AL29(11.5,-13.5) AL30(12.5,-13.5) AL31(13.5,-13.5) AL32(14.5,-13.5) AL33(15.5,-13.5) AL34(16.5,-13.5) AM1(-16.5,-14.5) AM2(-15.5,-14.5) AM3(-14.5,-14.5) AM4(-13.5,-14.5) AM5(-12.5,-14.5) AM6(-11.5,-14.5) AM7(-10.5,-14.5) AM8(-9.5,-14.5) AM9(-8.5,-14.5) AM10(-7.5,-14.5) AM11(-6.5,-14.5) AM12(-5.5,-14.5) AM13(-4.5,-14.5) AM14(-3.5,-14.5) AM15(-2.5,-14.5) AM16(-1.5,-14.5) AM17(-0.5,-14.5) AM18(0.5,-14.5) AM19(1.5,-14.5) AM20(2.5,-14.5) AM21(3.5,-14.5) AM22(4.5,-14.5) AM23(5.5,-14.5) AM24(6.5,-14.5) AM25(7.5,-14.5) AM26(8.5,-14.5) AM27(9.5,-14.5) AM28(10.5,-14.5) AM29(11.5,-14.5) AM30(12.5,-14.5) AM31(13.5,-14.5) AM32(14.5,-14.5) AM33(15.5,-14.5) AM34(16.5,-14.5) AN1(-16.5,-15.5) AN2(-15.5,-15.5) AN3(-14.5,-15.5) AN4(-13.5,-15.5) AN5(-12.5,-15.5) AN6(-11.5,-15.5) AN7(-10.5,-15.5) AN8(-9.5,-15.5) AN9(-8.5,-15.5) AN10(-7.5,-15.5) AN11(-6.5,-15.5) AN12(-5.5,-15.5) AN13(-4.5,-15.5) AN14(-3.5,-15.5) AN15(-2.5,-15.5) AN16(-1.5,-15.5) AN17(-0.5,-15.5) AN18(0.5,-15.5) AN19(1.5,-15.5) AN20(2.5,-15.5) AN21(3.5,-15.5) AN22(4.5,-15.5) AN23(5.5,-15.5) AN24(6.5,-15.5) AN25(7.5,-15.5) AN26(8.5,-15.5) AN27(9.5,-15.5) AN28(10.5,-15.5) AN29(11.5,-15.5) AN30(12.5,-15.5) AN31(13.5,-15.5) AN32(14.5,-15.5) AN33(15.5,-15.5) AN34(16.5,-15.5) AP1(-16.5,-16.5) AP2(-15.5,-16.5) AP3(-14.5,-16.5) AP4(-13.5,-16.5) AP5(-12.5,-16.5) AP6(-11.5,-16.5) AP7(-10.5,-16.5) AP8(-9.5,-16.5) AP9(-8.5,-16.5) AP10(-7.5,-16.5) AP11(-6.5,-16.5) AP12(-5.5,-16.5) AP13(-4.5,-16.5) AP14(-3.5,-16.5) AP15(-2.5,-16.5) AP16(-1.5,-16.5) AP17(-0.5,-16.5) AP18(0.5,-16.5) AP19(1.5,-16.5) AP20(2.5,-16.5) AP21(3.5,-16.5) AP22(4.5,-16.5) AP23(5.5,-16.5) AP24(6.5,-16.5) AP25(7.5,-16.5) AP26(8.5,-16.5) AP27(9.5,-16.5) AP28(10.5,-16.5) AP29(11.5,-16.5) AP30(12.5,-16.5) AP31(13.5,-16.5) AP32(14.5,-16.5) AP33(15.5,-16.5) AP34(16.5,-16.5) B1(-16.5,15.5) B2(-15.5,15.5) B3(-14.5,15.5) B4(-13.5,15.5) B5(-12.5,15.5) B6(-11.5,15.5) B7(-10.5,15.5) B8(-9.5,15.5) B9(-8.5,15.5) B10(-7.5,15.5) B11(-6.5,15.5) B12(-5.5,15.5) B13(-4.5,15.5) B14(-3.5,15.5) B15(-2.5,15.5) B16(-1.5,15.5) B17(-0.5,15.5) B18(0.5,15.5) B19(1.5,15.5) B20(2.5,15.5) B21(3.5,15.5) B22(4.5,15.5) B23(5.5,15.5) B24(6.5,15.5) B25(7.5,15.5) B26(8.5,15.5) B27(9.5,15.5) B28(10.5,15.5) B29(11.5,15.5) B30(12.5,15.5) B31(13.5,15.5) B32(14.5,15.5) B33(15.5,15.5) B34(16.5,15.5) C1(-16.5,14.5) C2(-15.5,14.5) C3(-14.5,14.5) C4(-13.5,14.5) C5(-12.5,14.5) C6(-11.5,14.5) C7(-10.5,14.5) C8(-9.5,14.5) C9(-8.5,14.5) C10(-7.5,14.5) C11(-6.5,14.5) C12(-5.5,14.5) C13(-4.5,14.5) C14(-3.5,14.5) C15(-2.5,14.5) C16(-1.5,14.5) C17(-0.5,14.5) C18(0.5,14.5) C19(1.5,14.5) C20(2.5,14.5) C21(3.5,14.5) C22(4.5,14.5) C23(5.5,14.5) C24(6.5,14.5) C25(7.5,14.5) C26(8.5,14.5) C27(9.5,14.5) C28(10.5,14.5) C29(11.5,14.5) C30(12.5,14.5) C31(13.5,14.5) C32(14.5,14.5) C33(15.5,14.5) C34(16.5,14.5) D1(-16.5,13.5) D2(-15.5,13.5) D3(-14.5,13.5) D4(-13.5,13.5) D5(-12.5,13.5) D6(-11.5,13.5) D7(-10.5,13.5) D8(-9.5,13.5) D9(-8.5,13.5) D10(-7.5,13.5) D11(-6.5,13.5) D12(-5.5,13.5) D13(-4.5,13.5) D14(-3.5,13.5) D15(-2.5,13.5) D16(-1.5,13.5) D17(-0.5,13.5) D18(0.5,13.5) D19(1.5,13.5) D20(2.5,13.5) D21(3.5,13.5) D22(4.5,13.5) D23(5.5,13.5) D24(6.5,13.5) D25(7.5,13.5) D26(8.5,13.5) D27(9.5,13.5) D28(10.5,13.5) D29(11.5,13.5) D30(12.5,13.5) D31(13.5,13.5) D32(14.5,13.5) D33(15.5,13.5) D34(16.5,13.5) E1(-16.5,12.5) E2(-15.5,12.5) E3(-14.5,12.5) E4(-13.5,12.5) E5(-12.5,12.5) E6(-11.5,12.5) E7(-10.5,12.5) E8(-9.5,12.5) E9(-8.5,12.5) E10(-7.5,12.5) E11(-6.5,12.5) E12(-5.5,12.5) E13(-4.5,12.5) E14(-3.5,12.5) E15(-2.5,12.5) E16(-1.5,12.5) E17(-0.5,12.5) E18(0.5,12.5) E19(1.5,12.5) E20(2.5,12.5) E21(3.5,12.5) E22(4.5,12.5) E23(5.5,12.5) E24(6.5,12.5) E25(7.5,12.5) E26(8.5,12.5) E27(9.5,12.5) E28(10.5,12.5) E29(11.5,12.5) E30(12.5,12.5) E31(13.5,12.5) E32(14.5,12.5) E33(15.5,12.5) E34(16.5,12.5) F1(-16.5,11.5) F2(-15.5,11.5) F3(-14.5,11.5) F4(-13.5,11.5) F5(-12.5,11.5) F6(-11.5,11.5) F7(-10.5,11.5) F8(-9.5,11.5) F9(-8.5,11.5) F10(-7.5,11.5) F11(-6.5,11.5) F12(-5.5,11.5) F13(-4.5,11.5) F14(-3.5,11.5) F15(-2.5,11.5) F16(-1.5,11.5) F17(-0.5,11.5) F18(0.5,11.5) F19(1.5,11.5) F20(2.5,11.5) F21(3.5,11.5) F22(4.5,11.5) F23(5.5,11.5) F24(6.5,11.5) F25(7.5,11.5) F26(8.5,11.5) F27(9.5,11.5) F28(10.5,11.5) F29(11.5,11.5) F30(12.5,11.5) F31(13.5,11.5) F32(14.5,11.5) F33(15.5,11.5) F34(16.5,11.5) G1(-16.5,10.5) G2(-15.5,10.5) G3(-14.5,10.5) G4(-13.5,10.5) G5(-12.5,10.5) G6(-11.5,10.5) G7(-10.5,10.5) G8(-9.5,10.5) G9(-8.5,10.5) G10(-7.5,10.5) G11(-6.5,10.5) G12(-5.5,10.5) G13(-4.5,10.5) G14(-3.5,10.5) G15(-2.5,10.5) G16(-1.5,10.5) G17(-0.5,10.5) G18(0.5,10.5) G19(1.5,10.5) G20(2.5,10.5) G21(3.5,10.5) G22(4.5,10.5) G23(5.5,10.5) G24(6.5,10.5) G25(7.5,10.5) G26(8.5,10.5) G27(9.5,10.5) G28(10.5,10.5) G29(11.5,10.5) G30(12.5,10.5) G31(13.5,10.5) G32(14.5,10.5) G33(15.5,10.5) G34(16.5,10.5) H1(-16.5,9.5) H2(-15.5,9.5) H3(-14.5,9.5) H4(-13.5,9.5) H5(-12.5,9.5) H6(-11.5,9.5) H7(-10.5,9.5) H8(-9.5,9.5) H9(-8.5,9.5) H10(-7.5,9.5) H11(-6.5,9.5) H12(-5.5,9.5) H13(-4.5,9.5) H14(-3.5,9.5) H15(-2.5,9.5) H16(-1.5,9.5) H17(-0.5,9.5) H18(0.5,9.5) H19(1.5,9.5) H20(2.5,9.5) H21(3.5,9.5) H22(4.5,9.5) H23(5.5,9.5) H24(6.5,9.5) H25(7.5,9.5) H26(8.5,9.5) H27(9.5,9.5) H28(10.5,9.5) H29(11.5,9.5) H30(12.5,9.5) H31(13.5,9.5) H32(14.5,9.5) H33(15.5,9.5) H34(16.5,9.5) J1(-16.5,8.5) J2(-15.5,8.5) J3(-14.5,8.5) J4(-13.5,8.5) J5(-12.5,8.5) J6(-11.5,8.5) J7(-10.5,8.5) J8(-9.5,8.5) J9(-8.5,8.5) J10(-7.5,8.5) J11(-6.5,8.5) J12(-5.5,8.5) J13(-4.5,8.5) J14(-3.5,8.5) J15(-2.5,8.5) J16(-1.5,8.5) J17(-0.5,8.5) J18(0.5,8.5) J19(1.5,8.5) J20(2.5,8.5) J21(3.5,8.5) J22(4.5,8.5) J23(5.5,8.5) J24(6.5,8.5) J25(7.5,8.5) J26(8.5,8.5) J27(9.5,8.5) J28(10.5,8.5) J29(11.5,8.5) J30(12.5,8.5) J31(13.5,8.5) J32(14.5,8.5) J33(15.5,8.5) J34(16.5,8.5) K1(-16.5,7.5) K2(-15.5,7.5) K3(-14.5,7.5) K4(-13.5,7.5) K5(-12.5,7.5) K6(-11.5,7.5) K7(-10.5,7.5) K8(-9.5,7.5) K9(-8.5,7.5) K10(-7.5,7.5) K11(-6.5,7.5) K12(-5.5,7.5) K13(-4.5,7.5) K14(-3.5,7.5) K15(-2.5,7.5) K16(-1.5,7.5) K17(-0.5,7.5) K18(0.5,7.5) K19(1.5,7.5) K20(2.5,7.5) K21(3.5,7.5) K22(4.5,7.5) K23(5.5,7.5) K24(6.5,7.5) K25(7.5,7.5) K26(8.5,7.5) K27(9.5,7.5) K28(10.5,7.5) K29(11.5,7.5) K30(12.5,7.5) K31(13.5,7.5) K32(14.5,7.5) K33(15.5,7.5) K34(16.5,7.5) L1(-16.5,6.5) L2(-15.5,6.5) L3(-14.5,6.5) L4(-13.5,6.5) L5(-12.5,6.5) L6(-11.5,6.5) L7(-10.5,6.5) L8(-9.5,6.5) L9(-8.5,6.5) L10(-7.5,6.5) L11(-6.5,6.5) L12(-5.5,6.5) L13(-4.5,6.5) L14(-3.5,6.5) L15(-2.5,6.5) L16(-1.5,6.5) L17(-0.5,6.5) L18(0.5,6.5) L19(1.5,6.5) L20(2.5,6.5) L21(3.5,6.5) L22(4.5,6.5) L23(5.5,6.5) L24(6.5,6.5) L25(7.5,6.5) L26(8.5,6.5) L27(9.5,6.5) L28(10.5,6.5) L29(11.5,6.5) L30(12.5,6.5) L31(13.5,6.5) L32(14.5,6.5) L33(15.5,6.5) L34(16.5,6.5) M1(-16.5,5.5) M2(-15.5,5.5) M3(-14.5,5.5) M4(-13.5,5.5) M5(-12.5,5.5) M6(-11.5,5.5) M7(-10.5,5.5) M8(-9.5,5.5) M9(-8.5,5.5) M10(-7.5,5.5) M11(-6.5,5.5) M12(-5.5,5.5) M13(-4.5,5.5) M14(-3.5,5.5) M15(-2.5,5.5) M16(-1.5,5.5) M17(-0.5,5.5) M18(0.5,5.5) M19(1.5,5.5) M20(2.5,5.5) M21(3.5,5.5) M22(4.5,5.5) M23(5.5,5.5) M24(6.5,5.5) M25(7.5,5.5) M26(8.5,5.5) M27(9.5,5.5) M28(10.5,5.5) M29(11.5,5.5) M30(12.5,5.5) M31(13.5,5.5) M32(14.5,5.5) M33(15.5,5.5) M34(16.5,5.5) N1(-16.5,4.5) N2(-15.5,4.5) N3(-14.5,4.5) N4(-13.5,4.5) N5(-12.5,4.5) N6(-11.5,4.5) N7(-10.5,4.5) N8(-9.5,4.5) N9(-8.5,4.5) N10(-7.5,4.5) N11(-6.5,4.5) N12(-5.5,4.5) N13(-4.5,4.5) N14(-3.5,4.5) N15(-2.5,4.5) N16(-1.5,4.5) N17(-0.5,4.5) N18(0.5,4.5) N19(1.5,4.5) N20(2.5,4.5) N21(3.5,4.5) N22(4.5,4.5) N23(5.5,4.5) N24(6.5,4.5) N25(7.5,4.5) N26(8.5,4.5) N27(9.5,4.5) N28(10.5,4.5) N29(11.5,4.5) N30(12.5,4.5) N31(13.5,4.5) N32(14.5,4.5) N33(15.5,4.5) N34(16.5,4.5) P1(-16.5,3.5) P2(-15.5,3.5) P3(-14.5,3.5) P4(-13.5,3.5) P5(-12.5,3.5) P6(-11.5,3.5) P7(-10.5,3.5) P8(-9.5,3.5) P9(-8.5,3.5) P10(-7.5,3.5) P11(-6.5,3.5) P12(-5.5,3.5) P13(-4.5,3.5) P14(-3.5,3.5) P15(-2.5,3.5) P16(-1.5,3.5) P17(-0.5,3.5) P18(0.5,3.5) P19(1.5,3.5) P20(2.5,3.5) P21(3.5,3.5) P22(4.5,3.5) P23(5.5,3.5) P24(6.5,3.5) P25(7.5,3.5) P26(8.5,3.5) P27(9.5,3.5) P28(10.5,3.5) P29(11.5,3.5) P30(12.5,3.5) P31(13.5,3.5) P32(14.5,3.5) P33(15.5,3.5) P34(16.5,3.5) R1(-16.5,2.5) R2(-15.5,2.5) R3(-14.5,2.5) R4(-13.5,2.5) R5(-12.5,2.5) R6(-11.5,2.5) R7(-10.5,2.5) R8(-9.5,2.5) R9(-8.5,2.5) R10(-7.5,2.5) R11(-6.5,2.5) R12(-5.5,2.5) R13(-4.5,2.5) R14(-3.5,2.5) R15(-2.5,2.5) R16(-1.5,2.5) R17(-0.5,2.5) R18(0.5,2.5) R19(1.5,2.5) R20(2.5,2.5) R21(3.5,2.5) R22(4.5,2.5) R23(5.5,2.5) R24(6.5,2.5) R25(7.5,2.5) R26(8.5,2.5) R27(9.5,2.5) R28(10.5,2.5) R29(11.5,2.5) R30(12.5,2.5) R31(13.5,2.5) R32(14.5,2.5) R33(15.5,2.5) R34(16.5,2.5) T1(-16.5,1.5) T2(-15.5,1.5) T3(-14.5,1.5) T4(-13.5,1.5) T5(-12.5,1.5) T6(-11.5,1.5) T7(-10.5,1.5) T8(-9.5,1.5) T9(-8.5,1.5) T10(-7.5,1.5) T11(-6.5,1.5) T12(-5.5,1.5) T13(-4.5,1.5) T14(-3.5,1.5) T15(-2.5,1.5) T16(-1.5,1.5) T17(-0.5,1.5) T18(0.5,1.5) T19(1.5,1.5) T20(2.5,1.5) T21(3.5,1.5) T22(4.5,1.5) T23(5.5,1.5) T24(6.5,1.5) T25(7.5,1.5) T26(8.5,1.5) T27(9.5,1.5) T28(10.5,1.5) T29(11.5,1.5) T30(12.5,1.5) T31(13.5,1.5) T32(14.5,1.5) T33(15.5,1.5) T34(16.5,1.5) U1(-16.5,0.5) U2(-15.5,0.5) U3(-14.5,0.5) U4(-13.5,0.5) U5(-12.5,0.5) U6(-11.5,0.5) U7(-10.5,0.5) U8(-9.5,0.5) U9(-8.5,0.5) U10(-7.5,0.5) U11(-6.5,0.5) U12(-5.5,0.5) U13(-4.5,0.5) U14(-3.5,0.5) U15(-2.5,0.5) U16(-1.5,0.5) U17(-0.5,0.5) U18(0.5,0.5) U19(1.5,0.5) U20(2.5,0.5) U21(3.5,0.5) U22(4.5,0.5) U23(5.5,0.5) U24(6.5,0.5) U25(7.5,0.5) U26(8.5,0.5) U27(9.5,0.5) U28(10.5,0.5) U29(11.5,0.5) U30(12.5,0.5) U31(13.5,0.5) U32(14.5,0.5) U33(15.5,0.5) U34(16.5,0.5) V1(-16.5,-0.5) V2(-15.5,-0.5) V3(-14.5,-0.5) V4(-13.5,-0.5) V5(-12.5,-0.5) V6(-11.5,-0.5) V7(-10.5,-0.5) V8(-9.5,-0.5) V9(-8.5,-0.5) V10(-7.5,-0.5) V11(-6.5,-0.5) V12(-5.5,-0.5) V13(-4.5,-0.5) V14(-3.5,-0.5) V15(-2.5,-0.5) V16(-1.5,-0.5) V17(-0.5,-0.5) V18(0.5,-0.5) V19(1.5,-0.5) V20(2.5,-0.5) V21(3.5,-0.5) V22(4.5,-0.5) V23(5.5,-0.5) V24(6.5,-0.5) V25(7.5,-0.5) V26(8.5,-0.5) V27(9.5,-0.5) V28(10.5,-0.5) V29(11.5,-0.5) V30(12.5,-0.5) V31(13.5,-0.5) V32(14.5,-0.5) V33(15.5,-0.5) V34(16.5,-0.5) W1(-16.5,-1.5) W2(-15.5,-1.5) W3(-14.5,-1.5) W4(-13.5,-1.5) W5(-12.5,-1.5) W6(-11.5,-1.5) W7(-10.5,-1.5) W8(-9.5,-1.5) W9(-8.5,-1.5) W10(-7.5,-1.5) W11(-6.5,-1.5) W12(-5.5,-1.5) W13(-4.5,-1.5) W14(-3.5,-1.5) W15(-2.5,-1.5) W16(-1.5,-1.5) W17(-0.5,-1.5) W18(0.5,-1.5) W19(1.5,-1.5) W20(2.5,-1.5) W21(3.5,-1.5) W22(4.5,-1.5) W23(5.5,-1.5) W24(6.5,-1.5) W25(7.5,-1.5) W26(8.5,-1.5) W27(9.5,-1.5) W28(10.5,-1.5) W29(11.5,-1.5) W30(12.5,-1.5) W31(13.5,-1.5) W32(14.5,-1.5) W33(15.5,-1.5) W34(16.5,-1.5) Y1(-16.5,-2.5) Y2(-15.5,-2.5) Y3(-14.5,-2.5) Y4(-13.5,-2.5) Y5(-12.5,-2.5) Y6(-11.5,-2.5) Y7(-10.5,-2.5) Y8(-9.5,-2.5) Y9(-8.5,-2.5) Y10(-7.5,-2.5) Y11(-6.5,-2.5) Y12(-5.5,-2.5) Y13(-4.5,-2.5) Y14(-3.5,-2.5) Y15(-2.5,-2.5) Y16(-1.5,-2.5) Y17(-0.5,-2.5) Y18(0.5,-2.5) Y19(1.5,-2.5) Y20(2.5,-2.5) Y21(3.5,-2.5) Y22(4.5,-2.5) Y23(5.5,-2.5) Y24(6.5,-2.5) Y25(7.5,-2.5) Y26(8.5,-2.5) Y27(9.5,-2.5) Y28(10.5,-2.5) Y29(11.5,-2.5) Y30(12.5,-2.5) Y31(13.5,-2.5) Y32(14.5,-2.5) Y33(15.5,-2.5) Y34(16.5,-2.5)
  silkscreen extent -18.22,-17.5 17.5,17.5, body extent -17.5,-17.5 17.5,17.5, height 3.1
C100 [mm] "1mm Diameter SMD Pad"
  round 1 smd paste-1: 1(0,0)
c170h100 [mm] "Plated Through Hole: Hole Dia.=1mm Pad Dia.=1.7mm, IPC-7251 Level A"
  round 1.7 hole 1: 1(0,0)
  silkscreen extent -1.2,-1.2 1.2,1.2
c600h270#1 [mm] "Plated Through Hole: Hole Dia.=2.7mm Pad Dia.=6.0mm"
  round 6 hole 2.7: 1(-1.15,166.961)
c600h270#2 [mm] "Plated Through Hole: Hole Dia.=2.7mm Pad Dia.=6.0mm"
  round 6 hole 2.7: 1(-11.25,162.211)
CAPC0603X33N#1 [mm] "Chip Capacitor, Body 0.6x0.30mm, IPC Medium Density"
  rect 0.45x0.4 smd: 1(-0.35,0) 2(0.35,0)
  body extent -0.31,-0.16 0.32,0.17, height 0.33
CAPC0603X33N#2 [mm] "Chip Capacitor, Body 0.6x0.30mm, IPC Medium Density"
  rect 0.5x0.45 smd paste-0.025 mask-0.025: 1(-0.35,0) 2(0.35,0)
  body extent -0.31,-0.16 0.32,0.17, height 0.33
CAPC1005X55N [mm] "Chip Capacitor, Body 1.0x0.55mm, IPC Medium Density"
  rect 0.62x0.62 smd: 1(-0.45,0) 2(0.45,0)
  body extent -0.52,-0.27 0.53,0.28, height 0.55
CAPC1608X87N [mm] "Chip Capacitor, Body 1.6x0.8mm IPC Medium Density"
  rect 0.95x1 smd: 1(-0.8,0) 2(0.8,0)
  body extent -0.87,-0.47 0.88,0.48, height 0.87
CAPC1608X90N [mm] "Chip Capacitor, Body 1.6x0.8mm IPC Medium Density"
  rect 0.95x0.95 smd: 1(-0.75,0) 2(0.75,0)
  body extent -0.85,-0.45 0.85,0.45, height 0.9
CAPC1709X100N [mm] "Capacitor,non-Polarized, Chip;1.65mm L X 0.85mm W X 1.00mm H, IPC Medium Density"
  rect 0.95x1.05 smd: 1(-0.8,0) 2(0.8,0)
  body extent -0.9,-0.5 0.9,0.5, height 1
CAPC2012X95N [mm] "Chip Capacitor, Body 2.0x1.25mm, IPC Medium Density"
  rect 1.1x1.45 smd: 1(-0.9,0) 2(0.9,0)
  silkscreen extent 0,-0.58 0,0.58, body extent -1.05,-0.67 1.05,0.68, height 0.95
CAPC2012X135N [mm] "Chip Capacitor, Body 2.0x1.25mm, IPC Medium Density"
  rect 1.05x1.4 smd: 1(-0.9,0) 2(0.9,0)
  silkscreen extent 0,-0.58 0,0.58, body extent -1.05,-0.67 1.05,0.68, height 1.25
CAPC3216X180N [mm] "Chip Capacitor, Body 3.2x1.6mm, IPC Medium Density"
  rect 1.15x1.8 smd: 1(-1.5,0) 2(1.5,0)
  silkscreen extent -0.55,-0.8 0.55,0.8, body extent -1.7,-0.9 1.7,0.9, height 1.8
CAPC3225X270N [mm] "Chip Capacitor, Body 3.2x2.5mm, IPC Medium Density"
  rect 1.15x2.7 smd: 1(-1.5,0) 2(1.5,0)
  silkscreen extent -0.55,-1.25 0.55,1.25, body extent -1.7,-1.35 1.7,1.35, height 2.7
CAPMP3216X180N [mm] "Capacitor, Polarized, Molded  Body 3.2x1.6mm, IPC Medium Density"
  rect 1.8x1.25 smd: 1(-1.3,0) 2(1.3,0)
  silkscreen extent -2.4,-0.7 0,1.25, body extent -1.7,-0.9 1.7,0.9, height 1.6
CAPMP3528X210N [mm] "Capacitor, Polarized, Molded  Body 3.5x2.8mm, IPC Medium Density"
  rect 1.8x2.25 smd: 1(-1.45,0) 2(1.45,0)
  silkscreen extent -2.49,-1.5 1.85,1.52, body extent -1.85,-1.5 1.85,1.5, height 2.1
CAPMP7343X190N [mm] "Capacitor, Polarized, Molded  Body 7.3x4.3mm, IPC Medium Density"
  rect 2.35x2.45 smd: 1(-3.1,0) 2(3.1,0)
  silkscreen extent -4.28,-2.15 3.65,2.27, body extent -3.8,-2.3 3.8,2.3, height 1.9
FIDUCIAL_TOP_S100-200 [mm] "Square Fiducial Target, Top Layer, 1.0mm, Top Solder 2.0mm, Keepout =2.0mm"
  rect 1x1 smd rot 45 paste-0.51 mask+0.5: 1(0,0)
  TopLayer keep-out region: 1.414,0 0,-1.414 -1.414,0 0,1.414
FP-PW0020A-MFG [mm]
  rect 1.6x0.3 smd paste-1000 mask+0: 1(-2.8,2.925) 2(-2.8,2.275) 3(-2.8,1.625) 4(-2.8,0.975) 5(-2.8,0.325) 6(-2.8,-0.325) 7(-2.8,-0.975) 8(-2.8,-1.625) 9(-2.8,-2.275) 10(-2.8,-2.925) 11(2.8,-2.925) 12(2.8,-2.275) 13(2.8,-1.625) 14(2.8,-0.975) 15(2.8,-0.325) 16(2.8,0.325) 17(2.8,0.975) 18(2.8,1.625) 19(2.8,2.275) 20(2.8,2.925)
  silkscreen extent -4.3,-3.3 1.63,3.3, body extent -3.7,-3.55 3.7,3.55, height 0.25
FUSR_BOURNS_MF-MSMF_STYLE1(H85) [mm] "PTC Resettable Fuse, MF-MSMS Series, Case Style 1 Height 0.85mm"
  rect 1.5x3.2 smd: 1(-2.1,0) 2(2.1,0)
  silkscreen extent -1.05,-1.71 1.05,1.71, body extent -2.36,-1.71 2.36,1.71, height 0.85
FUSR_BOURNS_MF-MSMF_STYLE2 [mm] "PTC Resettable Fuse, MF-MSMS Series, Case Style 2"
  rect 1.7x3 smd: 1(-2.4,0) 2(2.4,0)
  silkscreen extent -1.05,-1.71 1.05,1.71, body extent -2.36,-1.7 2.37,1.71, height 1.6
HIROSE_ZX62RD-AB-5P8 [mm] "Right Angle, SMD Micro-USB Type AB - Reverse (Top mount), Shell Through Hole"
  rect 0.4x1.35 smd: 1(1.3,0) 2(0.65,0) 3(0,0) 4(-0.65,0) 5(-1.3,0)
  rrect80% 1.225x1.9 hole 0.8 slot 1.5 at 90 deg: 6(-4.088,-2.8) 6(4.088,-2.8)
  rrect80% 1.05x1.25 hole 0.6 slot 0.85 at 90 deg: 6(-2.225,0.325) 6(2.225,0.325)
  rect 2.9x1.9 smd: PastePad(0,-2.8)
  TopLayer region: -4.2,-1.85 -4.2,-3.75 -3.3,-3.75 -3.3,-1.85
  TopLayer region: 4.2,-3.75 4.2,-1.85 3.3,-1.85 3.3,-3.75
  TopLayer keep-out lines w0.1: 3.75,-4.125 3.75,-4 3.05,-4 3.05,-1.6 3.75,-1.6 3.75,-0.825 1.7,-0.825 1.7,-1.025 -1.7,-1.025 -1.7,-0.825 -3.75,-0.825 -3.75,-1.6 -3.05,-1.6 -3.05,-4 -3.75,-4 -3.75,-4.125 -2.8,-4.125 -2.8,-2.45 cw(c-2.6,-2.45) -2.6,-2.25 -2.15,-2.25 cw(c-2.15,-2.45) -1.95,-2.45 -1.95,-4.125 -1.65,-4.125 -1.65,-1.65 1.65,-1.65 1.65,-4.125 1.95,-4.125 1.95,-2.45 cw(c2.15,-2.45) 2.15,-2.25 2.6,-2.25 cw(c2.6,-2.45) 2.8,-2.45 2.8,-4.125 3.75,-4.125
  KeepOutLayer board cut-out: 1.95,-4.125 1.95,-2.41 1.98,-2.337 2.037,-2.28 2.11,-2.25 2.64,-2.25 2.713,-2.28 2.77,-2.337 2.8,-2.41 2.8,-4.125
  KeepOutLayer board cut-out: -2.8,-4.125 -2.8,-2.41 -2.77,-2.337 -2.713,-2.28 -2.64,-2.25 -2.11,-2.25 -2.037,-2.28 -1.98,-2.337 -1.95,-2.41 -1.95,-4.125
  silkscreen extent -4,-5.42 4,1.28, body extent -4.32,-5.42 4.33,0.47, height 2.78
HSINK_ATS_ATS-50350B-C1-R0 [mm] "35.0 x 35.0 x 7.5 mm BGA Heat Sink, Body 49.9mm x 35mm  Height 7.5mm"
  silkscreen extent -22.45,-22.25 22.45,22.65, body extent -22.75,-22.75 22.75,22.75, height 11.25
IND_BOURNS_SRN3015 [mm] "SMD Inductor  Body Width 3.0mm Body Lenght 3.0mm Height 1.5mm, SRN3015 Series"
  rect 1x2.7 smd: 1(-1.1,0) 2(1.1,0)
  silkscreen extent -0.3,-1.5 0.3,1.5, body extent -1.51,-1.5 1.51,1.5, height 1.5
IND_WURTH_WE-PMCI_0806LR [mm] "SMD Power Molded Chip  Inductor (WE-PMCI Series), Body 2.0x1.6mm"
  rect 0.8x1.8 smd: 1(-0.8,0) 2(0.8,0)
  body extent -1,-0.8 1,0.8, height 1
INDC1608X65N [mm] "Chip Inductor, 2-Leads, EIA 0603, Metric 1608, Body 1.6x0.8mm, IPC Medium Density"
  rect 1x1 smd: 1(-0.75,0) 2(0.75,0)
  body extent -0.87,-0.47 0.88,0.48, height 0.65
INDC1608X95N [mm] "Chip Inductor, 2-Leads, EIA 0603, Metric 1608, Body 1.6x0.8mm, IPC Medium Density"
  rect 0.95x1 smd: 1(-0.8,0) 2(0.8,0)
  body extent -0.87,-0.47 0.88,0.48, height 0.95
INDC4516X180N [mm] "Inductor, Chip; 4.50mm L X 1.60mm W X 1.80mm H, IPC Medium Density"
  rect 1.4x1.8 smd: 1(-2,0) 2(2,0)
  silkscreen extent -0.95,-0.8 0.95,0.8, body extent -2.25,-0.8 2.25,0.8, height 1.8
Keystone_7687 [mm] "Polyphenylene Sulfide PPS Shoulder Washer"
  silkscreen extent -0.8,-5.6 0.8,5.6
LED_AVAGO_HSMC-C120 [mm] "Red Chip LED, 2-Leads, Body 1.7x1.1mm, Side Emitting Package"
  rect 0.8x0.7 smd: 1(-1,0) 2(1,0)
  rect 0.4x0.4 smd: 3(0,-0.35)
  silkscreen extent -1.12,-0.92 0.33,0.8, body extent -0.85,-0.3 0.85,0.8, height 0.7
LED_AVAGO_HSME-C120 [mm] "Green Chip LED, 2-Leads, Body 1.7x1.1mm, Side Emitting Package"
  rect 0.8x0.7 smd: 1(-1,0) 2(1,0)
  rect 0.4x0.4 smd: 3(0,-0.35)
  silkscreen extent -1.12,-0.92 -0.88,-0.67, body extent -0.85,-0.3 0.85,0.8, height 0.7
LED_KINGBRIGHT_KPH-1608CGCK [mm] "SMT Green LED, Case 0603, Body L 1.6 x W 0.8mm H 0.65mm"
  rect 0.8x0.8 smd: 1(-0.825,0) 2(0.825,0)
  silkscreen extent -1.82,-0.4 0.08,0.4, body extent -0.8,-0.4 0.8,0.4, height 0.65
MOLEX_22-27-2021 [mm] "2.54mm (.100\") Pitch KK® Header, Single Row, Vertical, 2 Circuits"
  rect 1.9x1.9 hole 1.2: 1(-1.27,0.002)
  round 1.9 hole 1.2: 2(1.27,-0.002)
  silkscreen extent -2.54,-2.88 2.54,2.92, body extent -2.54,-2.88 2.54,2.92, height 11.7
MOLEX_39-28-1043 [mm] "4.20mm (.165\") Pitch Mini-Fit Jr. Header, Dual Row, Vertical, without Snap-in Plastic Peg PCB Lock, 4 Circuits"
  round 2.1 hole 1.4: 1(-2.1,2.75) 2(2.1,2.75) 3(-2.1,-2.75) 4(2.1,-2.75)
  silkscreen extent -5.2,-6 5.2,5, body extent -5.2,-6 5.2,5, height 12.8
MOLEX_87832-1420 [mm] "Milli-Grid, Pitch 2mm, 14 contacts, Surface Mount Vertical Header With Locking Window And Centre Polarization Slot"
  rect 1x2.75 smd: 1(-6,-2.125) 2(-6,2.125) 3(-4,-2.125) 4(-4,2.125) 5(-2,-2.125) 6(-2,2.125) 7(0,-2.125) 8(0,2.125) 9(2,-2.125) 10(2,2.125) 11(4,-2.125) 12(4,2.125) 13(6,-2.125) 14(6,2.125)
  round 0.5 hole 1 unplated mask+0.25: 15(-5,0) 16(5,0)
  silkscreen extent -8.32,-4.19 8.32,3.15, body extent -8.32,-3.15 8.33,3.15, height 7.6
MPS_MPM54304GMN [mm] "MPS LGA-33 Case, 0.65mm Pitch, Rect. ; 32 Pin, 7.00mm L X 7.00mm W X 2.10mm H body (w/Thermal Tab 3.55 X 3.55mm)"
  rect 0.925x0.3 smd: 1(-2.963,1.633) 2(-2.963,0.983) 3(-2.963,0.325) 4(-3,-0.313) 5(-2.963,-0.983) 6(-2.963,-1.633) 17(2.963,-1.633) 18(2.963,-0.975) 19(2.963,-0.325) 20(2.963,0.325) 21(2.963,0.983) 22(2.963,1.633)
  rect 0.3x0.925 smd: 7(-2.925,-2.963) 8(-2.275,-2.963) 9(-1.625,-2.963) 10(-0.975,-2.963) 11(-0.325,-2.963) 12(0.325,-2.963) 13(0.975,-2.963) 14(1.625,-2.963) 15(2.275,-2.963) 16(2.925,-2.963) 23(2.925,2.963) 24(2.275,2.963) 25(1.625,2.963) 26(0.975,2.963) 27(0.325,2.963) 28(-0.325,2.963) 29(-0.975,2.963) 30(-1.625,2.963) 31(-2.275,2.963) 32(-2.925,2.963)
  rect 3.55x3.55 smd: 33(0,0)
  silkscreen extent -3.5,-3.5 3.5,3.5, body extent -3.5,-3.5 3.5,3.5, height 2.1
OSC_SILICON-LAB_SI510-6N [mm] "Oscillator Si510 Series, 6 pins, 5x7mm"
  rect 1.95x1.55 smd: 1(-2.1,2.54) 2(-2.1,0) 3(-2.1,-2.54) 4(2.1,-2.54) 5(2.1,0) 6(2.1,2.54)
  silkscreen extent -3.8,-3.5 0.78,3.5, body extent -2.5,-3.5 2.5,3.5, height 1.8
OSC_SILICON-LAB_SI549-A [mm] "Oscillator Si549 Series, 8 pins, 5x7mm"
  rect 1.95x1.55 smd: 1(-2.1,2.54) 2(-2.1,0) 3(-2.1,-2.54) 4(2.1,-2.54) 5(2.1,0) 6(2.1,2.54)
  rect 0.75x1.8 smd: 7(0,3.025) 8(0,-3.025)
  silkscreen extent -3.83,-1.78 0.77,2.62, body extent -2.5,-3.5 2.5,3.5, height 1.33
PTH-M3.4x6.0_BTKO [mm]
  round 6 hole 3.4: 1(0,0)
  BottomLayer keep-out region: -5,-3.05 -5,7.3 5,7.3 5,-3.05 1.173,-3.05 1.173,-3.056 2.504,-2.108 3.211,-0.635 3.118,0.997 2.247,2.38 0.817,3.169 -0.817,3.169 -2.247,2.38 -3.118,0.997 -3.211,-0.635 -2.504,-2.108 -1.173,-3.056 -1.173,-3.056 -1.173,-3.05
QFN40P140X180X55-10N [mm] "QFN, 0.40mm Pitch, Rect.;10 Pin, 1.80mm L X 1.40mm W X 0.55mm H Body, IPC Medium Density"
  oval 0.9x0.2 smd: 1(-0.65,0.2)
  oval 0.8x0.2 smd: 2(-0.7,-0.2) 6(0.7,-0.2) 7(0.7,0.2)
  oval 0.2x0.8 smd: 3(-0.4,-0.9) 4(0,-0.9) 5(0.4,-0.9) 8(0.4,0.9) 9(0,0.9) 10(-0.4,0.9)
  silkscreen extent -1.42,0.53 -1.3,0.67, body extent -0.7,-0.9 0.7,0.9, height 0.55
QFN50P400X400X100-25N-S220 [mm] "QFN, 0.50mm Pitch, Square; 24 Pin, 4.00mm L X 4.00mm W X 1.00mm H body (w/thermal tab 2.2 X 2.2mm), IPC Medium Density"
  oval 0.9x0.3 smd: 1(-1.95,1.25) 2(-1.95,0.75) 3(-1.95,0.25) 4(-1.95,-0.25) 5(-1.95,-0.75) 6(-1.95,-1.25) 13(1.95,-1.25) 14(1.95,-0.75) 15(1.95,-0.25) 16(1.95,0.25) 17(1.95,0.75) 18(1.95,1.25)
  oval 0.3x0.9 smd: 7(-1.25,-1.95) 8(-0.75,-1.95) 9(-0.25,-1.95) 10(0.25,-1.95) 11(0.75,-1.95) 12(1.25,-1.95) 19(1.25,1.95) 20(0.75,1.95) 21(0.25,1.95) 22(-0.25,1.95) 23(-0.75,1.95) 24(-1.25,1.95)
  rect 2.2x2.2 smd: 25(0,0)
  silkscreen extent -3.12,-2 2,2, body extent -2.07,-2.07 2.08,2.08, height 1